# Altium PCB DXES101B-659637.PcbDoc (part 2 of 2)
Units mm, origin at the board's own origin, x right, y up, seen from the top; angles counter-clockwise.
Board outline 125 x 80 mm, 4 copper layers (Top Layer, Layer 1, Layer 2, Bottom Layer), stack 1.883 mm thick; 290 components, 208 nets, 784 pads, 192 vias.
Unrouted connection lines stored in the file: 554.
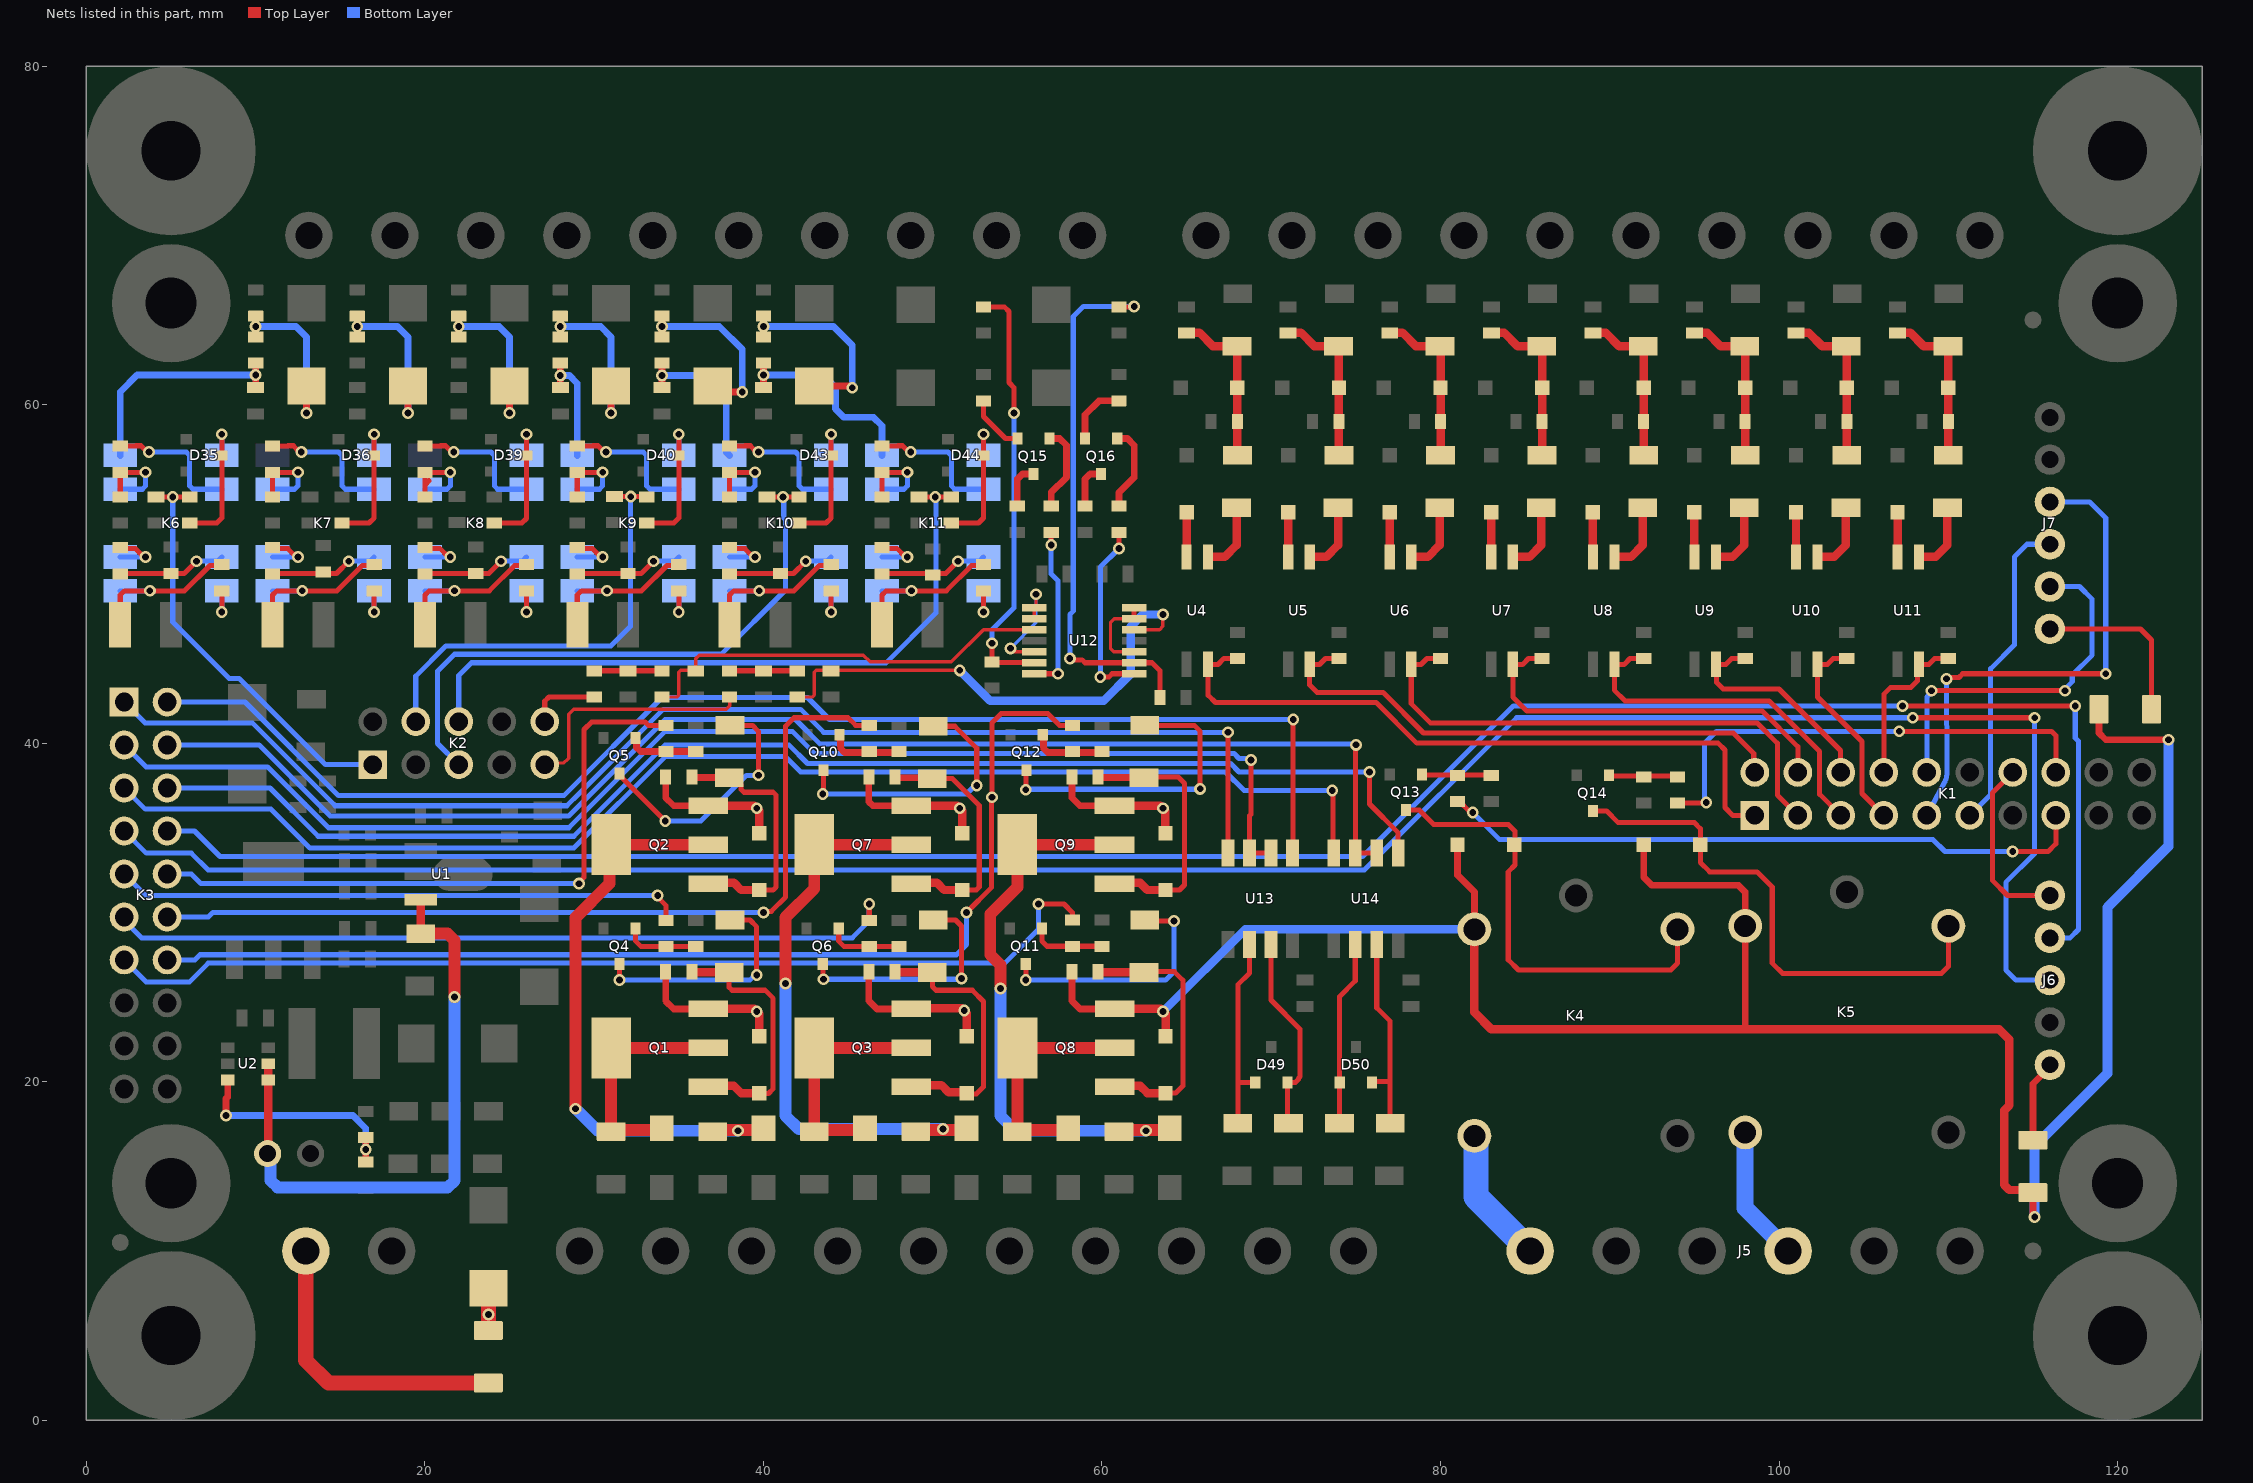
[diagram p4: the nets of this part, all layers, seen from the top]

## Via types
v1: diameter 0.7, hole 0.4, Top Layer to Bottom Layer, tented both sides, 192 vias

## Nets (pads, with @x,y where several pads share a name; then routed paths per layer and width w, separated by ;. In a path a pad name is that pad's centre, name@x,y a point inside that pad or via, vN(x,y) a via of type N, cw(c..) or ccw(c..) an arc to the next point about the centre after c; other vN are vias at no path point) (continued)
NetC23_2: C23.2 D19.2 R33.2 R34.1 R37.2 | length 9.8
  Top Layer w0.5: C23.2@65,64.225 65.025,64.25 65.75,64.25 66.55,63.45 R33.2@67.975,63.45 68,63.425 D19.2@68,61 R34.1@68,57
NetC24_2: C24.2 D20.2 R35.2 R36.1 R38.2 | length 9.7
  Top Layer w0.5: C24.2@71,64.225 71.025,64.25 71.75,64.25 72.55,63.45 R35.2@73.975,63.45 ; R36.1@74,57 R38.2@74,59 D20.2@74,61 R35.2@74,63.425
NetC25_2: C25.2 D23.2 R41.2 R42.1 R45.2 | length 9.7
  Top Layer w0.5: C25.2@77,64.225 77.025,64.25 77.75,64.25 78.55,63.45 R41.2@79.975,63.45 ; R42.1@80,57 D23.2@80,61 R41.2@80,63.425
NetC26_2: C26.2 D24.2 R43.2 R44.1 R46.2 | length 9.7
  Top Layer w0.5: C26.2@83,64.225 83.025,64.25 83.75,64.25 84.55,63.45 R43.2@85.975,63.45 ; R44.1@86,57 D24.2@86,61 R43.2@86,63.425
NetC27_2: C27.2 D27.2 R49.2 R50.1 R53.2 | length 9.7
  Top Layer w0.5: C27.2@89,64.225 89.025,64.25 89.75,64.25 90.55,63.45 R49.2@91.975,63.45 ; R50.1@92,57 D27.2@92,61 R49.2@92,63.425
NetC28_2: C28.2 D28.2 R51.2 R52.1 R54.2 | length 9.7
  Top Layer w0.5: C28.2@95,64.225 95.025,64.25 95.75,64.25 96.55,63.45 R51.2@97.975,63.45 ; R52.1@98,57 D28.2@98,61 R51.2@98,63.425
NetC29_2: C29.2 D31.2 R57.2 R58.1 R61.2 | length 9.7
  Top Layer w0.5: C29.2@101,64.225 101.025,64.25 101.75,64.25 102.55,63.45 R57.2@103.975,63.45 ; R58.1@104,57 D31.2@104,61 R57.2@104,63.425
NetC30_2: C30.2 D32.2 R59.2 R60.1 R62.2 | length 9.7
  Top Layer w0.5: C30.2@107,64.225 107.025,64.25 107.75,64.25 108.55,63.45 R59.2@109.975,63.45 ; R60.1@110,57 D32.2@110,61 R59.2@110,63.425
NetC31_2: C31.2 FB2.2 K6.4 | length 13.6
  Top Layer w0.4: C31.2@10,61 v1(10,61.75) FB2.2@10,62.45
  Bottom Layer w0.4: K6.4@2,57 2,60.75 3,61.75 v1(10,61.75)
NetC32_2: C32.2 FB3.2 K2.1 | length 24.7
  Top Layer w0.3: C32.2@4.1,54.55 v1(5.1,54.55) FB3.2@6.1,54.55
  Bottom Layer w0.3: v1(5.1,54.55) 5.1,47.16 8.435,43.825 9.025,43.825 14.12,38.73 K2.1@16.92,38.73
NetC33_2: C33.2 FB8.2 K9.4 | length 6.9
  Top Layer w0.4: C33.2@28,61 v1@28,61.75 ; v1(28,61.725) v1@28,61.75 ; FB8.2@28,62.45 v1@28,61.75
  Bottom Layer w0.4: v1(28,61.725) 28.009,61.716 28.534,61.716 29,61.25 K9.4@29,57
NetC34_2: C34.2 FB9.2 K2.4 | length 26.2
  Top Layer w0.3: C34.2@31.2,54.575 31.213,54.562 v1@32.15,54.562 ; v1(32.162,54.562) v1@32.15,54.562 ; FB9.2@33.1,54.55 33.088,54.562 v1@32.15,54.562
  Bottom Layer w0.3: K2.4@19.46,41.27 19.46,43.96 21.25,45.75 31,45.75 32.15,46.9 32.15,54.55 v1(32.162,54.562)
NetC35_2: C35.2 FB10.2 K10.4 | length 9.6
  Top Layer w0.4: C35.2@34,61 v1@34,61.75 ; v1(34,61.725) v1@34,61.75 ; FB10.2@34,62.45 v1@34,61.75
  Bottom Layer w0.4: v1(34,61.725) 37.025,61.725 37.798,60.952 37.798,57.202 K10.4@38,57
NetC36_2: C36.2 FB11.2 K2.5 | length 36
  Top Layer w0.3: C36.2@40.2,54.55 v1(41.15,54.55) FB11.2@42.1,54.55
  Bottom Layer w0.3: K2.5@22,38.73 20.75,39.98 20.75,44.25 21.75,45.25 37.5,45.25 41.3,49.05 41.3,53.2 41.2,53.3 41.2,54.5 v1(41.15,54.55)
NetC37_2: C37.2 FB12.2 K11.4 | length 12.2
  Top Layer w0.4: C37.2@40,61 v1(40,61.75) FB12.2@40,62.45
  Bottom Layer w0.4: v1(40,61.75) 43.5,61.75 44.25,61 44.25,59.75 44.75,59.25 46.5,59.25 47,58.75 K11.4@47,57
NetC38_2: C38.2 FB13.2 K2.6 | length 41.2
  Top Layer w0.3: C38.2@49.2,54.55 v1(50.15,54.55) FB13.2@51.1,54.55
  Bottom Layer w0.3: K2.6@22,41.27 22,44 22.75,44.75 47.25,44.75 50.2,47.7 50.2,54.5 v1(50.15,54.55)
NetC43_2: C43.2 R100.2 R101.1 | length 4
  Top Layer w0.3: R100.2@30,44.275 R101.1@34,44.275
NetC44_2: C44.2 R101.2 U12.3 | length 25.2
  Top Layer w0.2: R101.2@34,42.725 34.883,42.725 35,42.842 35,44.183 35.117,44.3 35.975,44.3 C44.2@36,44.275 36,45 36.2,45.2 45.9,45.2 46.3,44.8 51.1,44.8 53,46.7 U12.3@56,46.7
NetC45_2: C45.2 R106.2 R107.1 | length 4
  Top Layer w0.3: R106.2@38,44.275 R107.1@42,44.275
NetC46_2: C46.2 R107.2 U12.12 | length 30
  Top Layer w0.2: R107.2@42,42.725 42.883,42.725 43,42.842 43,44.183 43.117,44.3 43.975,44.3 C46.2@44,44.275 44.025,44.3 v1(51.6,44.3) ; U12.12@61.9,46.7 63.4,46.7 63.6,46.9 v1(63.6,47.6)
  Bottom Layer w0.5: v1(51.6,44.3) 53.4,42.5 54.3,42.5 60.1,42.5 61.7,44.1 61.7,46.9 62.4,47.6 v1(63.6,47.6)
NetD5_1: D5.1 Q1.1 R3.1 R6.2 | length 15.4
  Top Layer w0.3: R6.2@37.975,26.45 37.975,25.576 38.151,25.4 40.1,25.4 40.575,24.925 40.575,19.738 40.575,19.575 40.3,19.3 39.775,19.3 D5.1@39.75,19.325
  Top Layer w0.5: R3.1@35.775,26.5 35.8,26.475 R6.2@37.95,26.475 ; Q1.1@36.74,19.7 36.79,19.75 38.25,19.75 38.675,19.325 D5.1@39.75,19.325
NetD6_1: D6.1 Q2.1 R4.1 R7.2 | length 15.3
  Top Layer w0.3: R7.2@37.975,37.95 38.275,37.95 38.675,37.55 38.675,37.276 38.851,37.1 40.574,37.1 40.75,36.924 40.75,31.501 40.574,31.325 D6.1@39.75,31.325
  Top Layer w0.4: R4.1@35.775,38 35.8,37.975 37.95,37.975 R7.2@37.975,37.95
  Top Layer w0.5: Q2.1@36.74,31.7 36.79,31.75 38.25,31.75 38.675,31.325 D6.1@39.75,31.325
NetD7_1: D7.1 Q3.1 R5.1 R8.2 | length 15.8
  Top Layer w0.3: R8.2@49.975,26.45 49.975,25.625 50.2,25.4 52.334,25.4 53,24.734 53,19.7 52.575,19.275 D7.1@52.01,19.275
  Top Layer w0.5: R5.1@47.8,26.475 R8.2@49.95,26.475 ; Q3.1@49,19.75 49.05,19.8 50.51,19.8 50.935,19.375 D7.1@52.01,19.375
NetD8_2: D8.2 PSW1.1 Q1.2 Q1.4 | length 13.8
  Top Layer w0.7: D8.2@34,17.25 33.9,17.15 31.1,17.15 PSW1.1@31,17.05 Q1.4@31,22 Q1.2@36.74,22
NetD9_2: D9.2 PSW2.1 Q2.2 Q2.4 | length 35.4
  Top Layer w0.7: v1(28.9,18.4) 28.9,29.7 30.9,31.7 30.9,33.9 Q2.4@31,34 ; Q2.4@31.25,34 Q2.2@36.99,34 ; PSW2.1@37,17.05 37.1,17.15 39.9,17.15 D9.2@40,17.25
  Bottom Layer w0.7: v1(28.9,18.4) 30.2,17.1 v1(38.5,17.1)
NetD10_2: D10.2 PSW3.1 Q3.2 Q3.4 | length 13.8
  Top Layer w0.7: D10.2@46,17.25 45.9,17.15 43.1,17.15 PSW3.1@43,17.05 Q3.4@43,22 Q3.2@48.74,22
NetD11_1: D11.1 Q7.1 R15.1 R18.2 | length 14.8
  Top Layer w0.3: R18.2@49.975,37.9 51.162,37.9 52.75,36.312 52.75,31.501 52.574,31.325 D11.1@51.75,31.325
  Top Layer w0.4: R15.1@47.775,38 47.825,37.95 49.925,37.95 R18.2@49.975,37.9
  Top Layer w0.5: Q7.1@48.74,31.7 48.79,31.75 50.25,31.75 50.675,31.325 D11.1@51.75,31.325
NetD12_1: D12.1 Q8.1 R16.1 R19.2 | length 16.3
  Top Layer w0.3: R19.2@61.75,26.5 64.275,26.5 64.775,26 64.775,19.75 64.35,19.325 D12.1@63.525,19.325
  Top Layer w0.5: R16.1@59.8,26.475 R19.2@61.95,26.475 ; Q8.1@60.75,19.7 60.8,19.75 62.26,19.75 62.685,19.325 D12.1@63.76,19.325
NetD13_1: D13.1 Q9.1 R17.1 R20.2 | length 15.8
  Top Layer w0.3: R20.2@62.475,37.95 62.525,38 64.5,38 64.876,37.624 64.876,31.626 64.575,31.325 D13.1@63.75,31.325
  Top Layer w0.4: R17.1@59.775,38 59.8,37.975 62.45,37.975 R20.2@62.475,37.95
  Top Layer w0.5: Q9.1@60.74,31.7 60.79,31.75 62.25,31.75 62.675,31.325 D13.1@63.75,31.325
NetD14_2: D14.2 PSW4.1 Q7.2 Q7.4 | length 35.2
  Top Layer w0.7: v1(41.3,25.8) 41.3,29.7 43,31.4 Q7.4@43,34 Q7.2@48.74,34 ; PSW4.1@49,17.05 49.1,17.15 51.9,17.15 D14.2@52,17.25
  Bottom Layer w0.7: v1(41.3,25.8) 41.3,18 42.1,17.2 v1(50.6,17.2)
NetD15_2: D15.2 PSW5.1 Q8.2 Q8.4 | length 13.8
  Top Layer w0.7: Q8.4@55.01,22 Q8.4@55,21.99 ; D15.2@58,17.25 57.9,17.15 55.1,17.15 PSW5.1@55,17.05 Q8.4@55,21.99 ; Q8.2@60.74,21.99 Q8.4@55,21.99
NetD16_2: D16.2 PSW6.1 Q9.2 Q9.4 | length 34.7
  Top Layer w0.7: v1(54,25.5) 54,26.9 53.4,27.5 53.4,29.9 55,31.5 Q9.4@55,34 Q9.2@60.74,34 ; PSW6.1@61,17.05 61.1,17.15 63.9,17.15 D16.2@64,17.25
  Bottom Layer w0.7: v1(54,25.5) 54,18 54.9,17.1 v1(62.6,17.1)
NetD17_1: D17.1 K4.2 Q13.3 | length 27.1
  Top Layer w0.3: Q13.3@77.951,36.049 78.751,36.049 79.6,35.2 84,35.2 84.4,34.8 84.4,32.8 84,32.4 84,27.2 84.6,26.6 93.6,26.6 94,27 K4.2@94,29
NetD18_1: D18.1 K5.2 Q14.3 | length 31.3
  Top Layer w0.3: Q14.3@89,36 89.8,36 90.5,35.3 95,35.3 95.35,34.95 D18.1@95.35,34 95.35,32.95 95.9,32.4 98.7,32.4 99.6,31.5 99.6,27 100.2,26.4 109.6,26.4 110,26.8 K5.2@110,29.2
NetD21_2: D21.2 U4.2 | length 2.6
  Top Layer w0.5: U4.2@65,51 D21.2@65,53.65
NetD22_2: D22.2 U5.2 | length 2.6
  Top Layer w0.5: U5.2@71,51 D22.2@71,53.65
NetD25_2: D25.2 U6.2 | length 2.6
  Top Layer w0.5: U6.2@77,51 D25.2@77,53.65
NetD26_2: D26.2 U7.2 | length 2.6
  Top Layer w0.5: U7.2@83,51 D26.2@83,53.65
NetD29_2: D29.2 U8.2 | length 2.6
  Top Layer w0.5: U8.2@89,51 D29.2@89,53.65
NetD30_2: D30.2 U9.2 | length 2.6
  Top Layer w0.5: U9.2@95,51 D30.2@95,53.65
NetD33_2: D33.2 U10.2 | length 2.6
  Top Layer w0.5: U10.2@101,51 D33.2@101,53.65
NetD34_2: D34.2 U11.2 | length 2.6
  Top Layer w0.5: U11.2@107,51 D34.2@107,53.65
NetD35_3: D35.3 FB3.1 K6.5 | length 8.2
  Top Layer w0.3: FB3.1@6.1,53 7.7,53 8.001,53.301 8.001,57.625 v1(8,58.25)
  Bottom Layer w0.3: K6.5@8,57 v1(8,58.25)
NetD36_3: D36.3 FB5.1 K7.5 | length 8.2
  Top Layer w0.3: FB5.1@15.1,53 16.7,53 17.001,53.301 17.001,57.625 v1(17,58.25)
  Bottom Layer w0.3: K7.5@17,57 v1(17,58.25)
NetD37_2: D37.2 FB2.1 PTC2.2 | length 10.6
  Top Layer w0.4: FB2.1@10,64 v1(10,64.612) PTC2.2@10,65.225 ; v1(13,59.5) D37.2@13,61.1
  Bottom Layer w0.4: v1(10,64.612) 12.387,64.612 13,64 v1(13,59.5)
NetD38_2: D38.2 FB4.1 PTC3.2 | length 11.2
  Top Layer w0.4: v1(16,64.612) FB4.1@16,64 PTC3.2@16,65.225 ; v1(19,59.5) D38.2@19,61.1
  Bottom Layer w0.4: v1(16,64.612) 18.387,64.612 19,64 v1(19,59.5)
NetD39_3: D39.3 FB7.1 K8.5 | length 8.2
  Top Layer w0.3: FB7.1@24.1,53 25.724,53 26,53.276 D39.3@26,57 26,57.624 ; 26.001,57.625 v1(26,58.25)
  Bottom Layer w0.3: K8.5@26,57 v1(26,58.25)
NetD40_3: D40.3 FB9.1 K9.5 | length 8.2
  Top Layer w0.3: FB9.1@33.1,53 34.7,53 35.001,53.301 35.001,53.575 D40.3@35,57 35.001,57.625 v1@35.001,58.249
  Bottom Layer w0.3: K9.5@35,57 v1(35,58.25)
NetD41_2: D41.2 FB6.1 PTC4.2 | length 11.2
  Top Layer w0.4: v1(22,64.612) FB6.1@22,64 PTC4.2@22,65.225 ; v1(25,59.5) D41.2@25,61.1
  Bottom Layer w0.4: v1(22,64.612) 24.387,64.612 25,64 v1(25,59.5)
NetD42_2: D42.2 FB8.1 PTC5.2 | length 11.2
  Top Layer w0.4: v1(28,64.612) FB8.1@28,64 PTC5.2@28,65.225 ; v1(31,59.5) D42.2@31,61.1
  Bottom Layer w0.4: v1(28,64.612) 30.387,64.612 31,64 v1(31,59.5)
NetD43_3: D43.3 FB11.1 K10.5 | length 8.2
  Top Layer w0.3: FB11.1@42.1,53 43.7,53 44.001,53.301 44.001,57.625 v1(44,58.25)
  Bottom Layer w0.3: K10.5@44,57 v1(44,58.25)
NetD44_3: D44.3 FB13.1 K11.5 | length 8.2
  Top Layer w0.3: FB13.1@51.1,53 52.7,53 53.001,53.301 53.001,57.625 v1(53,58.25)
  Bottom Layer w0.3: K11.5@53,57 v1(53,58.25)
NetD45_2: D45.2 FB10.1 PTC6.2 | length 11.5
  Top Layer w0.4: v1(34,64.612) FB10.1@34,64 PTC6.2@34,65.225 ; D45.2@37,61.1 37.35,60.75 v1(38.75,60.75)
  Bottom Layer w0.4: v1(34,64.612) 37.388,64.612 38.75,63.25 v1(38.75,60.75)
NetD46_2: D46.2 FB12.1 PTC7.2 | length 12.3
  Top Layer w0.4: v1(40,64.612) FB12.1@40,64 PTC7.2@40,65.225 ; D46.2@43,61.1 45.069,61.1 45.169,61 v1(45.25,61)
  Bottom Layer w0.4: v1(40,64.612) 44.138,64.612 45.25,63.5 v1(45.25,61)
NetD49_1: D49.1 PSW7.1 U13.6 | length 11.9
  Top Layer w0.3: PSW7.1@68.025,17.55 68.025,19.9 ; U13.6@68.71,28.1 68.71,26.41 68.025,25.725 68.025,19.9 ; D49.1@69.05,19.95 68.075,19.95 68.025,19.9
NetD49_2: D49.2 PSW8.1 U13.7 | length 11.9
  Top Layer w0.3: U13.7@69.98,28.1 69.98,24.82 71.7,23.1 71.7,20.3 71.6,20.2 71.6,20.126 71.424,19.95 D49.2@70.95,19.95 70.95,17.625 PSW8.1@71.025,17.55
NetD50_1: D50.1 PSW9.1 U14.6 | length 10.9
  Top Layer w0.3: PSW9.1@74.025,17.55 74.025,25.025 74.96,25.96 U14.6@74.96,28.1
NetD50_2: D50.2 PSW10.1 U14.7 | length 12
  Top Layer w0.3: D50.2@75.95,19.95 76,20 77.025,20 ; U14.7@76.23,28.1 76.23,24.37 77.025,23.575 77.025,20 ; PSW10.1@77.025,17.55 77.025,20
NetJ6_1: J6.1 PTC10.1 | length 4.9
  Top Layer w0.4: PTC10.1@115,16.55 115,19.879 116,20.879 J6.1@116,21
NetJ6_3: J6.3 K3.7 | length 136
  Top Layer w0.3: v1(107.9,41.5) v1(115.1,41.5)
  Bottom Layer w0.3: K3.7@2.23,34.81 3.54,33.5 6.2,33.5 7.2,32.5 75.5,32.5 84.5,41.5 v1(107.9,41.5) ; 115.091,40.9 115.091,34.2 115.091,33.466 113.4,31.776 113.4,26.6 114,26 J6.3@116,26 ; 115.091,40.906 v1(115.1,41.5)
NetJ6_4: J6.4 K3.8 | length 132.2
  Top Layer w0.3: v1(107.3,42.2) v1(117.5,42.2)
  Bottom Layer w0.3: K3.8@4.77,34.81 6.39,34.81 7.9,33.3 75.4,33.3 84.3,42.2 v1(107.3,42.2) ; J6.4@116,28.5 117.2,28.5 117.69,28.99 117.69,40.11 117.5,40.3 v1(117.5,42.2)
NetJ6_5: J6.5 K1.14 | length 10.6
  Top Layer w0.3: K1.14@113.81,38.27 112.6,37.06 112.6,31.9 113.5,31 J6.5@116,31
NetJ7_1: J7.1 PTC11.1 | length 10.4
  Top Layer w0.3: J7.1@116,46.75 121.35,46.75 122,46.1 PTC11.1@122,42
NetK1_1: K1.1 R31.1 U4.4 | length 40.9
  Top Layer w0.3: R31.1@68,45 67.2,45 66.85,44.65 U4.4@66.27,44.65 66.27,42.83 66.7,42.4 76.2,42.4 78.6,40 96.4,40 96.8,39.6 96.8,36.2 97.27,35.73 K1.1@98.57,35.73
NetK1_2: K1.2 R32.1 U5.4 | length 32.2
  Top Layer w0.3: R32.1@74,45 73.2,45 72.85,44.65 U5.4@72.27,44.65 72.27,43.43 72.7,43 76.6,43 79,40.6 97.3,40.6 98.506,39.394 98.506,38.334 K1.2@98.57,38.27
NetK1_3: K1.3 R39.1 U6.4 | length 31.6
  Top Layer w0.3: R39.1@80,45 79.2,45 78.85,44.65 U6.4@78.27,44.65 78.27,42.33 79.4,41.2 98.7,41.2 99.9,40 99.9,36.94 K1.3@101.11,35.73
NetK1_4: K1.4 R40.1 U7.4 | length 23.4
  Top Layer w0.3: R40.1@86,45 85.2,45 84.85,44.65 U7.4@84.27,44.65 84.27,42.73 85.1,41.9 99,41.9 101.11,39.79 K1.4@101.11,38.27
NetK1_5: K1.5 R47.1 U8.4 | length 21.3
  Top Layer w0.3: R47.1@92,45 91.2,45 90.85,44.65 U8.4@90.27,44.65 90.27,43.13 90.9,42.5 99.4,42.5 102.4,39.5 102.4,36.98 K1.5@103.65,35.73
NetK1_6: K1.6 R48.1 U9.4 | length 13.2
  Top Layer w0.3: R48.1@98,45 97.2,45 96.85,44.65 U9.4@96.27,44.65 96.3,44.62 96.3,43.6 96.7,43.2 100,43.2 103.63,39.57 103.63,38.29 K1.6@103.65,38.27
NetK1_7: K1.7 R55.1 U10.4 | length 12.4
  Top Layer w0.3: R55.1@104,45 103.2,45 102.85,44.65 U10.4@102.27,44.65 102.27,42.73 104.9,40.1 104.9,37.02 K1.7@106.19,35.73
NetK1_8: K1.8 R56.1 U11.4 | length 9.8
  Top Layer w0.3: K1.8@106.19,38.27 106.19,42.89 106.6,43.3 107.8,43.3 108.167,43.667 108.167,44.547 U11.4@108.27,44.65 108.85,44.65 109.2,45 R56.1@110,45
NetK1_15: K1.15 R27.1 | length 38.4
  Top Layer w0.3: R27.1@81,36.55 81.125,36.55 81.698,35.977 81.823,35.977 v1(81.9,35.9) ; v1(113.8,33.6) 115.9,33.6 116.35,34.05 K1.15@116.35,35.73
  Bottom Layer w0.3: v1(81.9,35.9) 83.5,34.3 109.1,34.3 109.8,33.6 v1(113.8,33.6)
NetK1_16: K1.16 R29.1 | length 28.6
  Top Layer w0.3: R29.1@94,36.45 94.025,36.475 95.675,36.475 v1(95.7,36.5) ; v1(107.1,40.7) 116.1,40.7 116.35,40.45 K1.16@116.35,38.27
  Bottom Layer w0.3: v1(95.7,36.5) 95.6,36.6 95.6,40 96.3,40.7 v1(107.1,40.7)
NetK2_9: K2.9 R106.1 | length 14.4
  Top Layer w0.2: K2.9@27.08,38.73 27.18,38.83 28.211,38.83 28.431,39.05 28.45,39.05 28.5,39.1 28.5,41.7 28.8,42 37.8,42 38.017,42.217 38.017,42.708 R106.1@38,42.725
NetK2_10: K2.10 R100.1 | length 4.2
  Top Layer w0.3: K2.10@27.08,41.27 27.08,42.48 27.325,42.725 R100.1@30,42.725
NetK3_1: K3.1 U13.4 | length 78
  Top Layer w0.3: U13.4@67.44,33.5 v1(67.44,40.64)
  Bottom Layer w0.3: K3.1@2.23,42.43 3.46,41.2 9.8,41.2 14.7,36.3 28.386,36.3 29.143,37.057 ; 29.3,37.214 29.143,37.057 ; v1(67.44,40.64) 43.56,40.64 42.2,42 34.086,42 29.143,37.057
NetK3_2: K3.2 U13.1 | length 79.7
  Top Layer w0.3: U13.1@71.25,33.5 71.275,33.525 71.275,41.375 v1(71.3,41.4)
  Bottom Layer w0.3: K3.2@4.77,42.43 9.37,42.43 14.9,36.9 28.2,36.9 34,42.7 42.6,42.7 43.9,41.4 v1(71.3,41.4)
NetK3_3: K3.3 U13.2 U13.3 | length 78.5
  Top Layer w0.3: v1(68.8,39) 68.8,35.8 68.71,35.71 U13.3@68.71,33.5 U13.2@69.98,33.5
  Bottom Layer w0.3: K3.3@2.23,39.89 3.52,38.6 10.7,38.6 14.3,35 28.5,35 34.2,40.7 41.7,40.7 43,39.4 67.8,39.4 68.1,39.1 68.7,39.1 v1(68.8,39)
NetK3_4: K3.4 U14.2 U14.3 | length 82.6
  Top Layer w0.3: v1(75,39.9) 74.98,39.88 74.98,33.52 75,33.5 U14.2@76.23,33.5
  Bottom Layer w0.3: K3.4@4.77,39.89 10.21,39.89 14.4,35.7 28.493,35.7 34.193,41.4 41.9,41.4 43.36,39.94 74.96,39.94 v1(75,39.9)
NetK3_5: K3.5 U14.4 | length 79.6
  Top Layer w0.3: v1(73.6,37.2) 73.645,37.155 73.645,33.545 U14.4@73.69,33.5
  Bottom Layer w0.3: K3.5@2.23,37.35 3.48,36.1 10.9,36.1 13.2,33.8 28.8,33.8 34.2,39.2 41.3,39.2 42.2,38.3 67.3,38.3 68.4,37.2 v1(73.6,37.2)
NetK3_6: K3.6 U14.1 | length 80.6
  Top Layer w0.3: v1(75.8,38.3) 75.8,36.4 77.5,34.7 U14.1@77.5,33.5
  Bottom Layer w0.3: K3.6@4.77,37.35 10.85,37.35 13.7,34.5 28.793,34.5 34.193,39.9 41.5,39.9 42.6,38.8 67.6,38.8 68.1,38.3 v1(75.8,38.3)
NetK3_9: K3.9 R9.2 | length 33.7
  Top Layer w0.3: v1(33.75,31) 33.75,30.892 34.25,30.392 R9.2@34.25,29.525
  Bottom Layer w0.3: K3.9@2.23,32.27 3.5,31 v1(33.75,31)
NetK3_10: K3.10 R10.2 | length 38.9
  Top Layer w0.3: v1(29.1,31.7) 29.1,31.776 29.4,32.076 29.4,40.8 29.85,41.25 33,41.25 33.2,41.05 R10.2@34.25,41.05
  Bottom Layer w0.3: K3.10@4.77,32.27 6.2,32.27 6.77,31.7 v1(29.1,31.7)
NetK3_11: K3.11 R11.2 | length 47
  Top Layer w0.3: R11.2@46.25,29.525 v1(46.25,30.5)
  Bottom Layer w0.3: K3.11@2.23,29.73 2.23,29.52 3.25,28.5 45.25,28.5 46.25,29.5 v1(46.25,30.5)
NetK3_12: K3.12 R21.2 | length 52.5
  Top Layer w0.3: v1(40,30) 40.066,30.066 40.466,30.066 41.3,30.9 41.3,41 41.8,41.5 45,41.5 45.45,41.05 R21.2@46.25,41.05
  Bottom Layer w0.3: K3.12@4.77,29.73 7.2,29.73 7.47,30 v1(40,30)
NetK3_13: K3.13 R22.2 | length 60
  Top Layer w0.3: v1(56.25,30.5) 57.75,30.5 58.25,30 R22.2@58.25,29.55
  Bottom Layer w0.3: K3.13@2.23,27.19 3.519,25.901 6.1,25.901 7.199,27 54.25,27 56.25,29 v1(56.25,30.5)
NetK3_14: K3.14 R23.2 | length 66.6
  Top Layer w0.3: v1(52,30) 53.48,31.48 53.48,36.68 53.5,36.7 53.5,41.2 54.05,41.75 56.796,41.75 57.496,41.05 R23.2@58.25,41.05
  Bottom Layer w0.3: K3.14@4.77,27.19 6.4,27.19 6.71,27.5 51.4,27.5 52,28.1 v1(52,30)
  other v1: 53.5,36.8
NetK6_1: K6.1 R70.2 R71.1 | length 10.2
  Top Layer w0.3: R70.2@2,47 2,48.75 2.25,49 5.8,49 7.3,50.5 7.95,50.5 R71.1@8,50.55
  Bottom Layer w0.3: K6.1@2,49 3.5,49 v1(3.75,49)
NetK6_2: K6.2 R67.2 | length 3.2
  Top Layer w0.3: R67.2@2,51.55 2.058,51.492 2.9,51.492 3.392,51 v1(3.5,51)
  Bottom Layer w0.3: K6.2@2,51 v1(3.5,51)
NetK6_3: K6.3 R63.1 R65.1 | length 5.6
  Top Layer w0.3: R63.1@2,54.55 R65.1@2,56 v1(3.5,56)
  Bottom Layer w0.3: K6.3@2.3,55 K6.3@2,55 3.3,55 3.5,55.2 v1(3.5,56)
NetK6_6: K6.6 R65.2 | length 8.1
  Top Layer w0.3: R65.2@2,57.55 2.9,57.55 2.922,57.572 3.22,57.572 3.592,57.2 v1(3.7,57.2)
  Bottom Layer w0.3: v1(3.7,57.2) 5.9,57.2 6.1,57 6.1,55.2 6.3,55 K6.6@8,55
NetK6_7: K6.7 R67.1 R69.1 | length 6.4
  Top Layer w0.3: R67.1@2,50 2.013,50.012 4.987,50.012 R69.1@5,50.025 5.775,50.025 v1(6.5,50.75)
  Bottom Layer w0.3: v1(6.5,50.75) 7.75,50.75 K6.7@8,51
NetK6_8: K6.8 R71.2 | length 2.5
  Top Layer w0.3: v1(8,47.75) R71.2@8,49
  Bottom Layer w0.3: v1(8,47.75) K6.8@8,49
NetK7_1: K7.1 R73.2 R74.1 | length 10
  Top Layer w0.3: R73.2@11,47 11,48.75 11.25,49 14.8,49 16.3,50.5 16.95,50.5 R74.1@17,50.55
  Bottom Layer w0.3: K7.1@11,49 v1@12.5,49
  other v1: 12.75,49
NetK7_2: K7.2 R68.2 | length 3.2
  Top Layer w0.3: R68.2@11,51.55 11.058,51.492 11.9,51.492 12.392,51 v1(12.5,51)
  Bottom Layer w0.3: K7.2@11,51 v1(12.5,51)
NetK7_3: K7.3 R64.1 R66.1 | length 5.3
  Top Layer w0.3: R64.1@11,54.55 R66.1@11,56 v1(12.5,56)
  Bottom Layer w0.3: K7.3@11,55 12.3,55 12.5,55.2 v1(12.5,56)
NetK7_6: K7.6 R66.2 | length 8.1
  Top Layer w0.3: R66.2@11,57.55 11.9,57.55 11.922,57.572 12.22,57.572 12.592,57.2 v1(12.7,57.2)
  Bottom Layer w0.3: v1(12.7,57.2) 14.9,57.2 15.1,57 15.1,55.2 15.3,55 K7.6@17,55
NetK7_7: K7.7 R68.1 R72.1 | length 6.4
  Top Layer w0.3: R68.1@11,50 11.013,50.012 13.987,50.012 14,50.025 14.775,50.025 v1(15.5,50.75)
  Bottom Layer w0.3: v1(15.5,50.75) 16.75,50.75 K7.7@17,51
NetK7_8: K7.8 R74.2 | length 2.5
  Top Layer w0.3: v1(17,47.75) R74.2@17,49
  Bottom Layer w0.3: v1(17,47.75) K7.8@17,49
NetK8_1: K8.1 R82.2 R83.1 | length 10
  Top Layer w0.3: R82.2@20,47 20,48.75 20.25,49 23.8,49 25.3,50.5 25.95,50.5 R83.1@26,50.55
  Bottom Layer w0.3: K8.1@20,49 v1@21.5,49
  other v1: 21.75,49
NetK8_2: K8.2 R79.2 | length 4.2
  Top Layer w0.3: v1(21.5,51) 21.392,51 20.9,51.492 ; R79.2@20.058,51.492 20.9,51.492 ; R79.2@20.058,51.492 R79.2@20,51.55 R79.2@20.058,51.492 ; R79.2@20.058,51.492 20.9,51.492
  Bottom Layer w0.3: K8.2@20,51 v1(21.5,51)
NetK8_3: K8.3 R75.1 R77.1 | length 6.6
  Top Layer w0.3: 20.25,55.5 20,55.25 R75.1@20,54.55 R77.1@20,56 v1(21.5,56)
  Bottom Layer w0.3: K8.3@20.25,55 K8.3@20,55 21.3,55 21.5,55.2 v1(21.5,56)
NetK8_6: K8.6 R77.2 | length 8.1
  Top Layer w0.3: R77.2@20,57.55 20.9,57.55 20.922,57.572 21.22,57.572 21.592,57.2 v1(21.7,57.2)
  Bottom Layer w0.3: v1(21.7,57.2) 23.9,57.2 24.1,57 24.1,55.2 24.3,55 K8.6@26,55
NetK8_7: K8.7 R79.1 R81.1 | length 6.8
  Top Layer w0.3: v1(24.5,50.75) 23.775,50.025 R81.1@23,50.025 ; R79.1@20.012,50.012 R79.1@20,50 R79.1@20.012,50.012 ; R79.1@20.012,50.012 R81.1@22.987,50.012 ; R81.1@22.987,50.012 R81.1@23,50.025 ; R81.1@22.987,50.012 R81.1@23,50.025
  Bottom Layer w0.3: v1(24.5,50.75) K8.7@25.75,50.75 ; K8.7@25.75,50.75 K8.7@26,51 K8.7@25.75,50.75
NetK8_8: K8.8 R83.2 | length 2.5
  Top Layer w0.3: v1(26,47.75) R83.2@26,49
  Bottom Layer w0.3: v1(26,47.75) K8.8@26,49
NetK9_1: K9.1 R85.2 R86.1 | length 10
  Top Layer w0.3: R85.2@29,47 29,48.75 29.25,49 32.8,49 34.3,50.5 34.95,50.5 R86.1@35,50.55
  Bottom Layer w0.3: K9.1@29,49 v1@30.5,49
  other v1: 30.75,49
NetK9_2: K9.2 R80.2 | length 3.2
  Top Layer w0.3: R80.2@29,51.55 29.058,51.492 29.9,51.492 30.392,51 v1(30.5,51)
  Bottom Layer w0.3: K9.2@29,51 v1(30.5,51)
NetK9_3: K9.3 R76.1 R78.1 | length 5.3
  Top Layer w0.3: R76.1@29,54.55 R78.1@29,56 v1(30.5,56)
  Bottom Layer w0.3: K9.3@29,55 30.3,55 30.5,55.2 v1(30.5,56)
NetK9_6: K9.6 R78.2 | length 8.1
  Top Layer w0.3: R78.2@29,57.55 29.9,57.55 29.922,57.572 30.22,57.572 30.592,57.2 v1(30.7,57.2)
  Bottom Layer w0.3: v1(30.7,57.2) 32.9,57.2 33.1,57 33.1,55.2 33.3,55 K9.6@35,55
NetK9_7: K9.7 R80.1 R84.1 | length 6.4
  Top Layer w0.3: R80.1@29,50 29.012,50.012 31.987,50.012 R84.1@32,50.025 32.775,50.025 v1(33.5,50.75)
  Bottom Layer w0.3: v1(33.5,50.75) 34.75,50.75 K9.7@35,51
NetK9_8: K9.8 R86.2 | length 2.5
  Top Layer w0.3: v1(35,47.75) R86.2@35,49
  Bottom Layer w0.3: v1(35,47.75) K9.8@35,49
NetK10_1: K10.1 R94.2 R95.1 | length 10
  Top Layer w0.3: R94.2@38,47 38,48.75 38.25,49 41.8,49 43.3,50.5 43.95,50.5 R95.1@44,50.55
  Bottom Layer w0.3: K10.1@38,49 v1@39.5,49
  other v1: 39.75,49
NetK10_2: K10.2 R91.2 | length 3.2
  Top Layer w0.3: R91.2@38,51.55 38.058,51.492 38.9,51.492 39.392,51 v1(39.5,51)
  Bottom Layer w0.3: K10.2@38,51 v1(39.5,51)
NetK10_3: K10.3 R87.1 R89.1 | length 5.3
  Top Layer w0.3: R87.1@38,54.55 R89.1@38,56 v1(39.5,56)
  Bottom Layer w0.3: K10.3@38,55 39.3,55 39.5,55.2 v1(39.5,56)
NetK10_6: K10.6 R89.2 | length 8.1
  Top Layer w0.3: R89.2@38,57.55 38.9,57.55 38.922,57.572 39.22,57.572 39.592,57.2 v1(39.7,57.2)
  Bottom Layer w0.3: v1(39.7,57.2) 41.9,57.2 42.1,57 42.1,55.2 42.3,55 K10.6@44,55
NetK10_7: K10.7 R91.1 R93.1 | length 6.4
  Top Layer w0.3: R91.1@38,50 38.012,50.012 40.987,50.012 R93.1@41,50.025 41.775,50.025 v1(42.5,50.75)
  Bottom Layer w0.3: v1(42.5,50.75) 43.75,50.75 K10.7@44,51
NetK10_8: K10.8 R95.2 | length 2.5
  Top Layer w0.3: v1(44,47.75) R95.2@44,49
  Bottom Layer w0.3: v1(44,47.75) K10.8@44,49
NetK11_1: K11.1 R97.2 R98.1 | length 10
  Top Layer w0.3: R97.2@47,47 47,48.75 47.25,49 50.8,49 52.3,50.5 52.95,50.5 R98.1@53,50.55
  Bottom Layer w0.3: K11.1@47,49 v1@48.5,49
  other v1: 48.75,49
NetK11_2: K11.2 R92.2 | length 3.2
  Top Layer w0.3: R92.2@47,51.55 47.058,51.492 47.9,51.492 48.392,51 v1(48.5,51)
  Bottom Layer w0.3: K11.2@47,51 v1(48.5,51)
NetK11_3: K11.3 R88.1 R90.1 | length 5.3
  Top Layer w0.3: R88.1@47,54.55 R90.1@47,56 v1(48.5,56)
  Bottom Layer w0.3: K11.3@47,55 48.3,55 48.5,55.2 v1(48.5,56)
NetK11_6: K11.6 R90.2 | length 8.1
  Top Layer w0.3: R90.2@47,57.55 47.9,57.55 47.922,57.572 48.22,57.572 48.592,57.2 v1(48.7,57.2)
  Bottom Layer w0.3: v1(48.7,57.2) 50.9,57.2 51.1,57 51.1,55.2 51.3,55 K11.6@53,55
NetK11_7: K11.7 R92.1 R96.1 | length 6.4
  Top Layer w0.3: R92.1@47,50 47.012,50.012 49.987,50.012 50,50.025 50.775,50.025 v1(51.5,50.75)
  Bottom Layer w0.3: v1(51.5,50.75) 52.75,50.75 K11.7@53,51
NetK11_8: K11.8 R98.2 | length 2.5
  Top Layer w0.3: v1(53,47.75) R98.2@53,49
  Bottom Layer w0.3: v1(53,47.75) K11.8@53,49
NetPTC8_2: PTC8.2 Q15.2 | length 3.5
  Top Layer w0.3: PTC8.2@53,60.225 53,59.3 54.3,58 Q15.2@55,58
NetPTC9_2: PTC9.2 Q16.2 | length 3.7
  Top Layer w0.4: Q16.2@59,58 59,59.4 59.825,60.225 PTC9.2@61,60.225
NetQ4_1: Q4.1 R9.1 R12.2 | length 4.4
  Top Layer w0.3: Q4.1@32.45,29.05 32.45,28.3 32.775,27.975 R9.1@34.25,27.975 R12.2@36,27.975
NetQ4_3: Q4.3 R6.1 | length 13.8
  Top Layer w0.3: v1(31.5,26) Q4.3@31.5,26.95 ; R6.1@38.025,29.55 39.2,29.55 39.6,29.15 v1(39.6,26.3)
  Bottom Layer w0.3: v1(31.5,26) 39.192,26 39.492,26.3 v1(39.6,26.3)
NetQ5_1: Q5.1 R10.1 R13.2 | length 4.2
  Top Layer w0.4: Q5.1@32.45,40.3 32.5,40.25 32.5,39.75 32.75,39.5 R13.2@36,39.5
NetQ5_3: Q5.3 R7.1 | length 15
  Top Layer w0.3: Q5.3@31.5,38.2 31.65,38.05 31.65,37.95 v1(34.2,35.4) ; R7.1@38.025,41.05 39.35,41.05 39.7,40.7 v1(39.7,38.1)
  Bottom Layer w0.3: v1(34.2,35.4) 36.3,35.4 39,38.1 v1(39.7,38.1)
NetQ6_1: Q6.1 R11.1 R14.2 | length 4.4
  Top Layer w0.3: Q6.1@44.45,29.05 44.45,28.3 44.775,27.975 R14.2@48,27.975
NetQ6_3: Q6.3 R8.1 | length 14
  Top Layer w0.3: Q6.3@43.5,26.95 43.525,26.925 43.525,26.075 v1(43.55,26.05) ; R8.1@50.025,29.55 51.35,29.55 51.7,29.2 v1(51.7,26.1)
  Bottom Layer w0.3: v1(43.55,26.05) 51.65,26.05 v1(51.7,26.1)
NetQ10_1: Q10.1 R21.1 R24.2 | length 4.2
  Top Layer w0.4: Q10.1@44.5,40.25 44.55,40.2 44.55,39.7 44.8,39.45 R24.2@48.05,39.45
NetQ10_3: Q10.3 R18.1 | length 16
  Top Layer w0.3: v1(43.5,37) 43.55,37.05 Q10.3@43.55,38.4 ; R18.1@50.025,41 51.3,41 52.6,39.7 v1(52.6,37.5)
  Bottom Layer w0.3: v1(43.5,37) 51.992,37 52.492,37.5 v1(52.6,37.5)
NetQ11_1: Q11.1 R22.1 R25.2 | length 4.4
  Top Layer w0.3: Q11.1@56.45,29.05 56.45,28.3 56.75,28 R22.1@58.25,28 R25.2@60,28
NetQ11_3: Q11.3 R19.1 | length 14.7
  Top Layer w0.3: v1(55.5,26) Q11.3@55.5,26.95 ; R19.1@62.525,29.55 62.575,29.5 v1(64.25,29.5)
  Bottom Layer w0.3: v1(55.5,26) 63.75,26 64.25,26.5 v1(64.25,29.5)
NetQ12_1: Q12.1 R23.1 R26.2 | length 4.2
  Top Layer w0.4: Q12.1@56.5,40.25 56.55,40.2 56.55,39.7 56.8,39.45 R26.2@60.05,39.45
NetQ12_3: Q12.3 R20.1 | length 18.3
  Top Layer w0.3: v1(55.5,37.25) 55.5,38.35 Q12.3@55.55,38.4 ; R20.1@62.525,41.05 65.45,41.05 65.8,40.7 v1(65.8,37.3)
  Bottom Layer w0.3: v1(55.5,37.25) 55.525,37.275 65.775,37.275 v1(65.8,37.3)
NetQ13_1: Q13.1 R27.2 R28.1 | length 4.1
  Top Layer w0.3: Q13.1@78.901,38.149 78.925,38.125 82.975,38.125 R28.1@83,38.1
NetQ14_1: Q14.1 R29.2 R30.1 | length 4.1
  Top Layer w0.3: Q14.1@89.95,38.1 90,38.05 93.95,38.05 R29.2@94,38
NetQ15_1: Q15.1 R102.2 | length 5.1
  Top Layer w0.4: Q15.1@56.9,58 57.5,58 57.9,57.6 57.9,55.7 57,54.8 R102.2@57,54
NetQ15_3: Q15.3 R99.1 | length 2.7
  Top Layer w0.4: R99.1@55,54 55,55.6 55.3,55.9 Q15.3@55.95,55.9
NetQ16_1: Q16.1 R108.2 | length 5.1
  Top Layer w0.4: Q16.1@60.9,58 61.5,58 61.9,57.6 61.9,55.7 61,54.8 R108.2@61,54
NetQ16_3: Q16.3 R105.1 | length 2.7
  Top Layer w0.4: R105.1@59,54 59,55.6 59.3,55.9 Q16.3@59.95,55.9
NetR1_1: R1.1 R2.2 U2.3 | length 13.4
  Top Layer w0.4: v1(8.25,18) 8.25,19 8.35,19.1 U2.3@8.35,20.1 ; R2.2@16.5,15.25 v1(16.5,16) R1.1@16.5,16.7
  Bottom Layer w0.4: v1(8.25,18) 15.75,18 16.5,17.25 v1(16.5,16)
NetR34_2: R34.2 U4.1 | length 4.2
  Top Layer w0.5: U4.1@66.27,51 67.25,51 67.95,51.7 R34.2@67.95,53.9
NetR36_2: R36.2 U5.1 | length 4.2
  Top Layer w0.5: U5.1@72.27,51 73.25,51 73.95,51.7 R36.2@73.95,53.9
NetR42_2: R42.2 U6.1 | length 4.2
  Top Layer w0.5: U6.1@78.27,51 79.25,51 79.95,51.7 R42.2@79.95,53.9
NetR44_2: R44.2 U7.1 | length 4.2
  Top Layer w0.5: U7.1@84.27,51 85.25,51 85.95,51.7 R44.2@85.95,53.9
NetR50_2: R50.2 U8.1 | length 4.2
  Top Layer w0.5: U8.1@90.27,51 91.25,51 91.95,51.7 R50.2@91.95,53.9
NetR52_2: R52.2 U9.1 | length 4.2
  Top Layer w0.5: U9.1@96.27,51 97.25,51 97.95,51.7 R52.2@97.95,53.9
NetR58_2: R58.2 U10.1 | length 4.2
  Top Layer w0.5: U10.1@102.27,51 103.25,51 103.95,51.7 R58.2@103.95,53.9
NetR60_2: R60.2 U11.1 | length 4.2
  Top Layer w0.5: U11.1@108.27,51 109.25,51 109.95,51.7 R60.2@109.95,53.9
NetR102_1: R102.1 U12.7 | length 9.9
  Top Layer w0.3: U12.7@56,44.1 v1(57.4,44.1) ; v1(57,51.7) R102.1@57,52.45
  Bottom Layer w0.3: v1(57,51.7) 57,50 57.4,49.6 v1(57.4,44.1)
NetR103_1: R103.1 R104.1 U12.6 | length 25.5
  Top Layer w0.3: R103.1@53,65.775 54.225,65.775 54.5,65.5 54.5,61.3 54.8,61 v1(54.8,59.5) ; v1(53.5,45.9) R104.1@53.5,44.8 53.525,44.775 55.975,44.775 U12.6@56,44.75
  Bottom Layer w0.3: v1(53.5,45.9) 53.5,46.7 54.8,48 v1(54.8,59.5)
NetR108_1: R108.1 U12.8 | length 11.1
  Top Layer w0.3: v1(59.9,43.9) 60.4,43.9 60.6,44.1 U12.8@61.9,44.1 ; v1(61,51.5) R108.1@61,52.45
  Bottom Layer w0.3: v1(59.9,43.9) 59.9,50.4 v1(61,51.5)
NetR109_1: R109.1 R110.1 U12.9 | length 32.2
  Top Layer w0.3: v1(58.1,45) 58.177,44.923 58.827,44.923 59,44.75 U12.9@61.9,44.75 62.95,44.75 63.425,44.275 R110.1@63.425,42.7 ; R109.1@61,65.775 61.875,65.775 v1(61.9,65.8)
  Bottom Layer w0.3: v1(58.1,45) 58.1,47.6 58.3,47.8 58.3,65.2 58.9,65.8 v1(61.9,65.8)
NetU12_1: U12.1 U12.2 U12.5 | length 6.8
  Top Layer w0.2: v1(54.6,45.6) 54.8,45.4 U12.5@56,45.4 ; U12.2@56,47.35 U12.1@56,48 56.1,48.1 v1(56.1,48.8)
  Bottom Layer w0.2: v1(54.6,45.6) 56.1,47.1 v1(56.1,48.8)
NetU12_10: U12.10 U12.13 U12.14 | length 5.1
  Top Layer w0.2: U12.13@61.897,47.347 60.734,47.347 60.5,47.113 60.5,45.6 60.7,45.4 U12.10@61.9,45.4
  Top Layer w0.3: U12.13@61.9,47.35 U12.14@61.9,48
NO0: J5.1 K4.4 | length 8.2
  Bottom Layer w1.5: K4.4@82,16.8 82.096,16.704 82.096,13.204 J5.1@85.3,10
NO1: J5.4 K5.4 | length 8.1
  Bottom Layer w1: K5.4@98,17 98,12.54 J5.4@100.54,10
RTS: J7.3 K1.11 | length 18.8
  Bottom Layer w0.3: K1.11@111.27,35.73 112.5,36.96 112.5,44.4 113.9,45.8 113.9,51 114.65,51.75 J7.3@116,51.75
RX2: J7.4 K1.9 | length 30.8
  Top Layer w0.3: v1(109.9,43.8) 109.977,43.877 110.627,43.877 110.85,44.1 v1(119.3,44.1)
  Bottom Layer w0.3: K1.9@108.73,35.73 109.788,37.703 ccw(c108.73,38.27) 109.927,38.19 ccw(c108.73,38.27) 109.93,38.277 v1(109.9,43.8) ; J7.4@116,54.25 118.35,54.25 119.3,53.3 v1(119.3,44.1)
TX2: J7.2 K1.10 | length 21.7
  Top Layer w0.3: v1(109,43.1) v1(116.9,43.1)
  Bottom Layer w0.3: K1.10@108.73,38.27 108.73,42.722 109,42.992 v1(109,43.1) ; J7.2@116,49.25 117.75,49.25 118.5,48.5 118.5,45.2 117.322,44.022 117.322,43.63 116.9,43.208 v1(116.9,43.1)
VSYS: C1.2 C6.1 D3.1 D5.2 D6.2 D7.2 D11.2 D12.2 D13.2 D17.2 D18.2 K4.1 K5.1 PTC1.2 PTC10.2 PTC11.2 Q1.3 Q2.3 Q3.3 Q7.3 Q8.3 Q9.3 R3.2 R4.2 R5.2 R15.2 R16.2 R17.2 U1.3 U2.4 U2.5 | length 219.6
  Top Layer w0.4: R3.2@34.225,26.5 34.225,24.775 34.7,24.3 Q1.3@36.74,24.3 ; R4.2@34.225,38 34.225,36.775 34.7,36.3 Q2.3@36.74,36.3 ; R5.2@46.225,26.5 46.225,24.775 46.7,24.3 Q3.3@48.74,24.3 Q3.3@48.775,24.335 ; R15.2@46.225,38 46.225,36.534 46.459,36.3 Q7.3@48.74,36.3 ; R16.2@58.225,26.5 58.225,24.775 58.7,24.3 Q8.3@60.74,24.3 ; R17.2@58.225,38 58.225,36.775 58.7,36.3 Q9.3@60.74,36.3 ; Q8.3@60.75,24.3 Q8.3@60.775,24.325 ; D17.2@81,34 81,32.2 82,31.2 K4.1@82,29 ; D18.2@92,34 92,32.1 92.5,31.6 97.6,31.6 98,31.2 K5.1@98,29.2 98,23.1 ; PTC10.2@115,13.45 115,12.1 v1(115.1,12) ; PTC11.2@118.9,42 118.9,40.6 119.3,40.2 v1(123,40.2)
  Top Layer w0.5: C6.1@10.71,15.75 10.75,15.79 U2.4@10.75,20.1 U2.5@10.75,21.05 ; C1.2@19.75,28.75 U1.3@19.75,30.75 ; Q1.3@36.74,24.3 39.45,24.3 v1(39.6,24.15) 39.75,24 D5.2@39.75,22.675 ; Q2.3@36.74,36.3 39.45,36.3 v1(39.6,36.15) 39.75,36 D6.2@39.75,34.675 ; Q7.3@48.74,36.3 51.45,36.3 v1(51.6,36.15) 51.75,36 D11.2@51.75,34.675 ; Q3.3@49,24.35 51.71,24.35 52.01,24.05 D7.2@52.01,22.725 ; Q9.3@60.74,36.3 63.45,36.3 v1(63.6,36.15) 63.75,36 D13.2@63.75,34.675 ; Q8.3@60.75,24.3 63.46,24.3 v1(63.61,24.15) 63.76,24 D12.2@63.76,22.675 ; K4.1@82,29 82,24.1 83,23.1 98,23.1 113,23.1 113.6,22.5 113.6,18.6 113.3,18.3 113.3,13.9 113.6,13.6 114.85,13.6 PTC10.2@115,13.45
  Top Layer w0.7: C1.2@19.75,28.75 21.34,28.75 21.75,28.34 v1(21.75,25)
  Top Layer w0.9: PTC1.2@23.75,5.3 D3.1@23.75,7.8
  Bottom Layer w0.5: v1(63.61,24.15) 68.46,29 K4.1@82,29
  Bottom Layer w0.6: v1(115.1,12) 115.1,16.2 119.4,20.5 119.4,30.3 123,33.9 ; 123,34 v1(123,40.2)
  Bottom Layer w0.7: C6.1@10.71,15.75 10.882,15.578 10.882,14.16 11.292,13.75 21.34,13.75 21.75,14.16 v1(21.75,25)
  other v1: 23.75,6.25 51.86,24.2
VSYSIN: J3.1 PTC1.1 | length 17.8
  Top Layer w0.9: J3.1@12.96,10 12.96,3.54 14.3,2.2 PTC1.1@23.75,2.2
pads on no net: FD1. FD2. FD3. K1.13 K1.17 K1.18 K1.19 K1.20 K3.15 K3.16

## Polygon pours and split planes (outlines as drawn)
GND on Bottom Layer "NONET_L-01_P-001" (solid, pour order 1): 0,0 0,80 63,80 63,48 113,48 113,67 114,68 114,80 126,80 126,0 113,0 113,34 79,34 79,0
GND on Top Layer "NONET_L-01_P-001" (solid, pour order 0): 0,0 0,80 63,80 63,48 113,48 113,67 114,68 114,80 126,80 126,0 113,0 113,34 79,34 79,0
GND on Layer 2 (split plane): 124.49,0.51 0.51,0.51 0.51,79.49 124.49,79.49
3,3V on Layer 1 (split plane): 124.49,0.51 113.129,0.51 113.129,34 113.12,34.05 113.092,34.092 113.05,34.12 113,34.129 79,34.129 78.95,34.12 78.908,34.092 78.88,34.05 78.871,34 78.871,0.51 65.502,0.51 65.502,37.2 65.493,37.298 65.464,37.392 65.418,37.479 65.355,37.555 65.279,37.618 65.192,37.664 65.098,37.693 65,37.702 30,37.702 29.902,37.693 29.808,37.664 29.721,37.618 29.645,37.555 29.582,37.479 29.536,37.392 29.507,37.298 29.498,37.2 29.498,20.502 18.208,20.502 14.355,24.355 14.279,24.418 14.192,24.464 14.098,24.493 14,24.502 10,24.502 9.902,24.493 9.808,24.464 9.721,24.418 9.645,24.355 9.582,24.279 9.536,24.192 9.507,24.098 9.498,24 9.498,18.502 0.51,18.502 0.51,43.971 52.8,43.971 52.85,43.98 52.892,44.008 54.692,45.808 54.72,45.85 54.729,45.9 54.729,64.7 54.72,64.75 54.692,64.792 51.329,68.154 51.329,79.49 62.498,79.49 62.498,50 62.507,49.902 62.536,49.808 62.582,49.721 62.645,49.645 63.645,48.645 64.645,47.645 64.721,47.582 64.808,47.536 64.902,47.507 65,47.498 112,47.498 112.098,47.507 112.192,47.536 112.279,47.582 112.355,47.645 113.355,48.645 113.418,48.721 113.464,48.808 113.493,48.902 113.502,49 113.502,66.792 114.355,67.645 114.418,67.721 114.464,67.808 114.493,67.902 114.502,68 114.502,79.49 124.49,79.49
3,3VA on Layer 1 (split plane): 51.071,68.1 51.08,68.05 51.108,68.008 54.471,64.646 54.471,45.954 52.746,44.229 0.51,44.229 0.51,79.49 51.071,79.49
VSYS on Layer 1 (split plane): 64.498,0.51 0.51,0.51 0.51,17.498 10,17.498 10.098,17.507 10.192,17.536 10.279,17.582 10.355,17.645 10.418,17.721 10.464,17.808 10.493,17.902 10.502,18 10.502,23.498 13.792,23.498 17.645,19.645 17.721,19.582 17.808,19.536 17.902,19.507 18,19.498 30,19.498 30.098,19.507 30.192,19.536 30.279,19.582 30.355,19.645 30.418,19.721 30.464,19.808 30.493,19.902 30.502,20 30.502,36.698 64.498,36.698
3,3V on Layer 1 (split plane): 112.871,0.51 79.129,0.51 79.129,33.871 112.871,33.871
GND_ISO on Layer 1 (split plane): 113.498,68.208 112.645,67.355 112.582,67.279 112.536,67.192 112.507,67.098 112.498,67 112.498,49.208 111.792,48.502 65.208,48.502 64.355,49.355 63.502,50.208 63.502,79.49 113.498,79.49

## Keep-outs
Keep-Out Layer:
  lines w1: 63,68 63,50 64.5,48.5 112.5,48.5 112.5,64.5 113.5,65.5 113.5,68.5 ; 80,15 80,19 84,19 84,15 ; 86,29.2 86,33.2 90,33.2 90,29.2 ; 92,15.2 92,19.2 96,19.2 ; 100,15.2 100,19.2 96,19.2 ; 102,29.4 102,33.4 106,33.4 106,29.4 ; 108,15.2 108,19.2 112,19.2 112,15.2 ; 96,19.2 96,15.2 96,19.2

## Other copper
Layer 1 (plane layer: these items are gaps in the copper):
  lines w0.254: 0,44.1 52.8,44.1 54.6,45.9 54.6,64.7 51.2,68.1 51.2,80.1 ; 79,0 79,34 113,34 113,0
  lines w1: 0,18 10,18 10,24 14,24 18,20 26,20 30,20 30,37.2 65,37.2 65,0 ; 63,80 63,50 64,49 65,48 101,48 105,48 109,48 112,48 113,49 113,67 114,68 114,80

## Silkscreen, mask and mechanical layers (free items; w line width, h text height)
Top Overlay:
  text "L" at 67.8,40.209 h4
  text "659637" at 69.7,38.45 h1.52
Mechanical 1:
  the board outline again, w0.5